# Altium PCB XRACER-R07.PcbDoc (part 2 of 2)
Units mm, origin at the board's own origin, x right, y up, seen from the top; angles counter-clockwise.
Board outline 36 x 36 mm, 4 copper layers (TOP, 2, 3, BOT); 135 components, 122 nets, 557 pads, 407 vias.
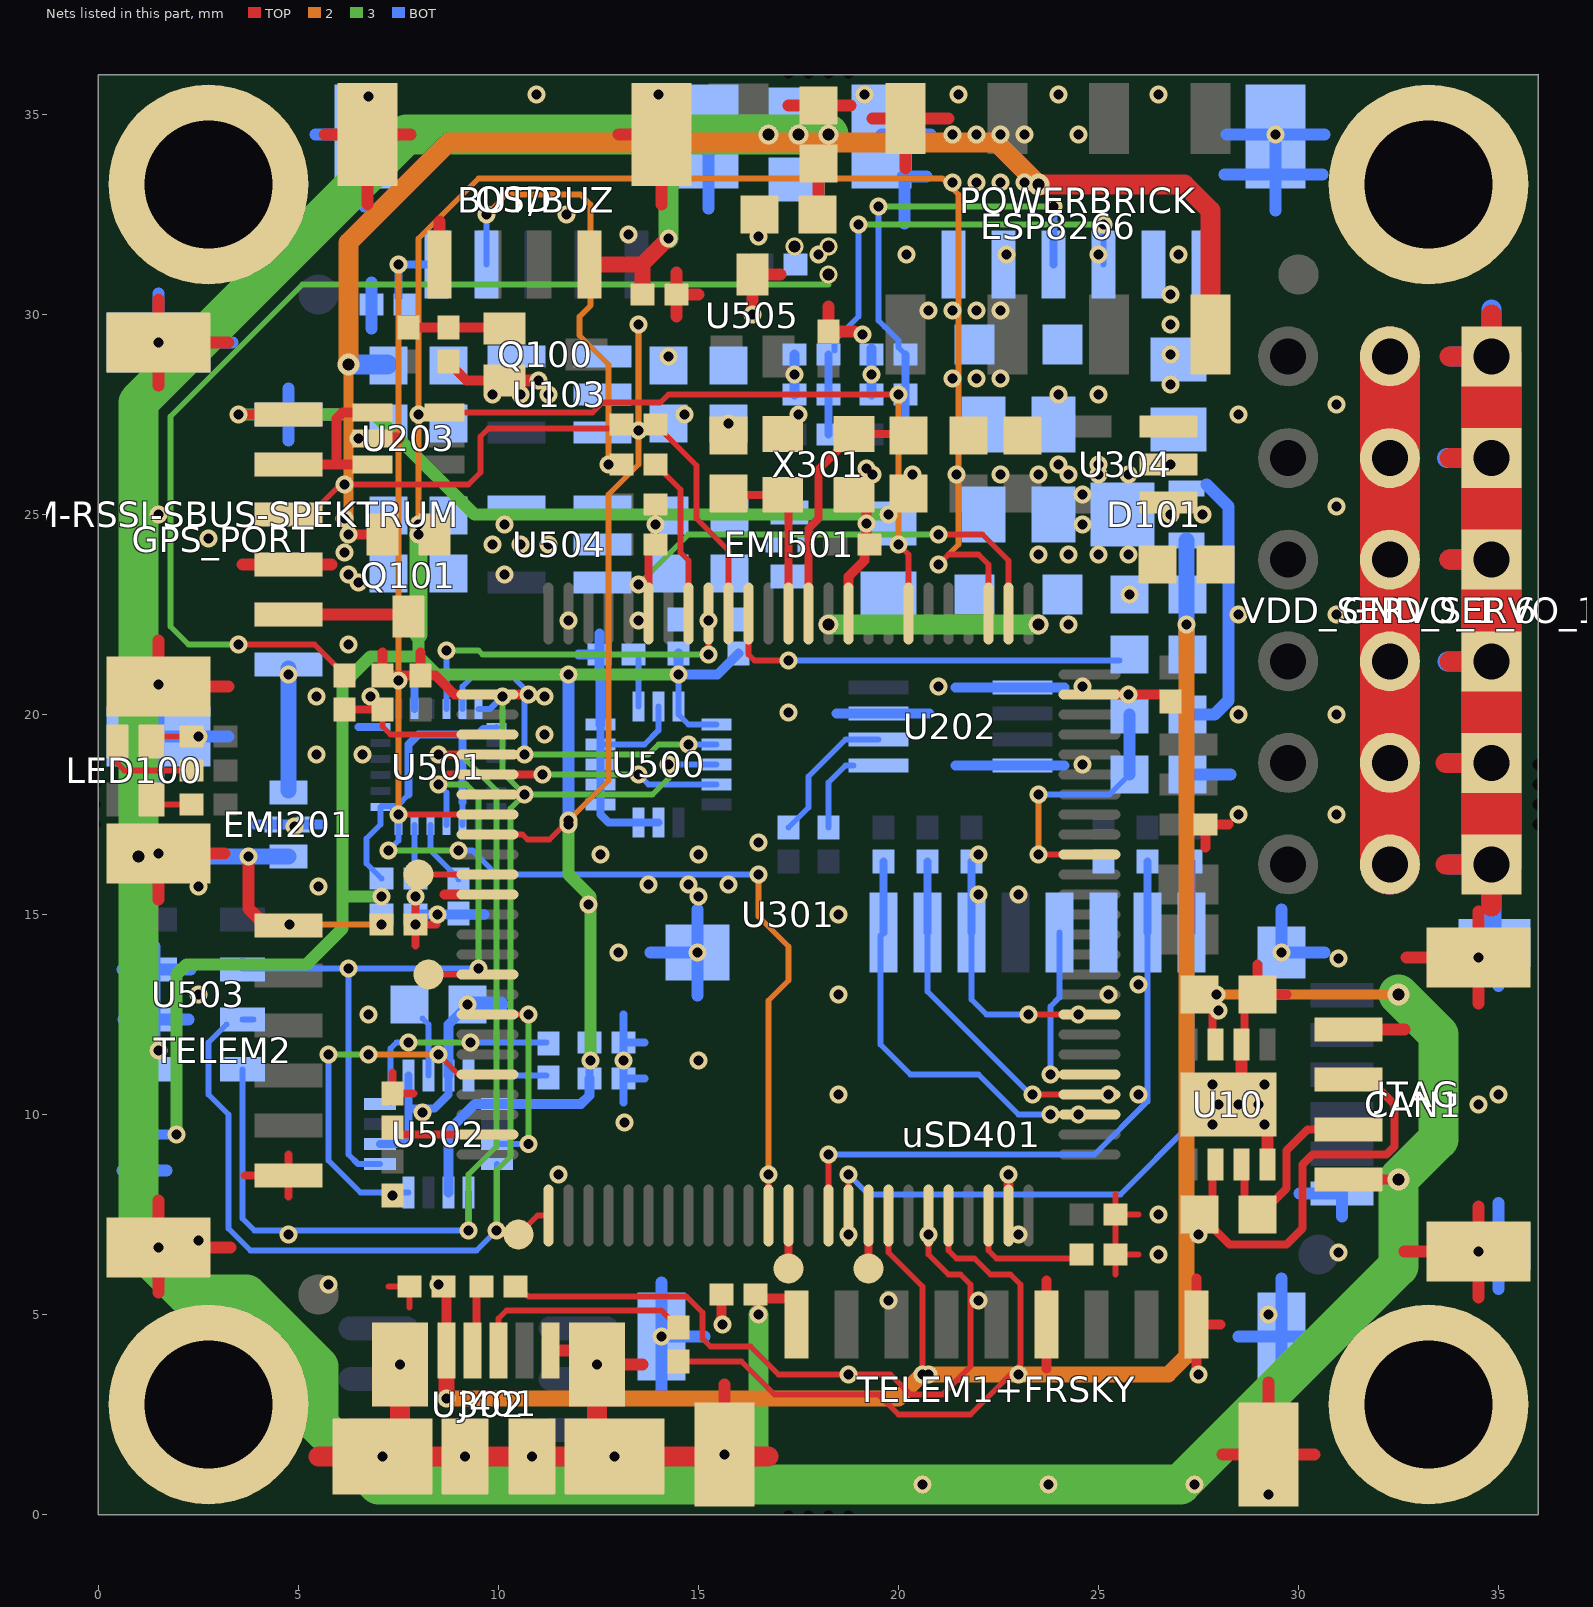
[diagram p4: the nets of this part, all layers, seen from the top]

## Via types
v1: diameter 0.45, hole 0.25, TOP to 2, tented both sides, 152 vias
v2: diameter 0.45, hole 0.25, 3 to BOT, tented bottom, 135 vias
v3: diameter 0.45, hole 0.25, TOP to BOT, tented both sides, 87 vias
v4: diameter 0.45, hole 0.25, TOP to 2, tented top, 6 vias
v5: diameter 0.45, hole 0.25, 3 to BOT, 6 vias
v6: diameter 0.45, hole 0.25, 3 to BOT, tented both sides, 5 vias
v7: diameter 0.5, hole 0.3, 3 to BOT, tented bottom, 5 vias
v8: diameter 0.45, hole 0.3, 3 to BOT, tented bottom, 3 vias
v9: diameter 0.45, hole 0.25, TOP to BOT, tented top, 3 vias
v10: diameter 0.55, hole 0.3, TOP to BOT, tented both sides, 3 vias
v11: diameter 0.55, hole 0.3, 3 to BOT, tented bottom, 1 vias
v12: diameter 0.55, hole 0.3, TOP to 2, tented top, 1 vias

## Nets (pads, with @x,y where several pads share a name; then routed paths per layer and width w, separated by ;. In a path a pad name is that pad's centre, name@x,y a point inside that pad or via, vN(x,y) a via of type N, cw(c..) or ccw(c..) an arc to the next point about the centre after c; other vN are vias at no path point) (continued)
GND: BUT/BUZ.GND C103.1 C105.1 C118.1 C119.1 C120.1 C301.1 C302.1 C303.1 C304.2 C305.2 C310.1 C311.1 C312.1 C313.1 C314.1 C315.1 C316.1 C317.1 C318.1 C319.1 C401.1 C402.2 C403.2 C404.1 C405.2 C501.1 C502.1 C503.1 C505.1 C508.1 C509.1 C510.1 C511.1 C520.1 C521.1 C523.1 C524.1 C525.1 C526.1 C601.2 C602.2 C603.2 CAN1.4 CAN1.GND EMI201.3 EMI201.4 EMI501.3 EMI501.4 ESP8266.2 G1.1 G2.1 G3.1 G4.1 GND_SERVO_1_6.1 GND_SERVO_1_6.2 GND_SERVO_1_6.3 GND_SERVO_1_6.4 GND_SERVO_1_6.5 GND_SERVO_1_6.6 GPS_PORT.6 GPS_PORT.GND J401.5 J401.6 J401.7 JTAG.6 JTAG.GND OSD.4 OSD.GND POWERBRICK.1 POWERBRICK.2 POWERBRICK.GND PPM-RSSI-SBUS-SPEKTRUM.4 PPM-RSSI-SBUS-SPEKTRUM.GND Q100.2 R104.1 R105.2 R131.2 R140.1 R301.2 R404.2 R407.2 R408.2 R431.2 TELEM1+FRSKY.6 TELEM1+FRSKY.9 TELEM1+FRSKY.GND TELEM2.6 TELEM2.GND TVS103.1 U10.2 U10.8 U10.EP U103.2 U202.1 U202.4 U202.7 U203.2 U301.10 U301.20 U301.27 U301.37 U301.74 U301.99 U302.4 U304.2 U500.7 U500.8 U500.9 U500.10 U500.11 U500.12 U500.13 U500.15 U501.11 U501.18 U501.20 U502.6 U502.9 U502.11 U503.2 U503.3 U504.2 U505.3 uSD401.6 uSD401.GND X301.2 X301.4 | length 286.2
  TOP w0.15: 7.25,5.7 C401.1@7.775,5.7 7.775,5.175 ; 25.425,6 C311.1@25.425,7.5 ; C305.2@25.425,6.5 26,6.5 ; 25.425,8 C311.1@25.425,7.5 ; 26,7.5 C311.1@25.425,7.5
  TOP w0.2: 3.65,8.475 TELEM2.6@4.75,8.475 ; 4.75,7.95 TELEM2.6@4.75,8.475 ; 4.75,9 TELEM2.6@4.75,8.475 ; 7.35,11.05 C304.2@7.35,10.525 7.875,10.525 ; 7.925,14.225 v1(7.925,14.75) ; 7.925,15.275 v1(7.925,14.75) ; 8.45,14.75 v1(7.925,14.75) ; U301.20@13.75,22.525 C316.1@13.75,24.1 ; C316.1@13.925,24.25 C315.1@13.925,25.25 ; U10.2@28.65,12.089 C404.1@28.65,12.6
  TOP w0.25: 7.1,21.55 R431.2@7.1,20.975 8.425,20.975 8.9,20.5 U301.27@9.725,20.5 v1(10.75,20.5) ; C312.1@8.05,20.975 8.05,21.55 ; 8.65,15.5 U301.37@9.725,15.5 ; R131.2@8.75,28.825 8.75,28.8 9.2,28.35 Q100.2@10.15,28.35 ; v1@15.575,4.9 C603.2@15.575,5.5 ; U301.10@18.75,22.525 18.75,23.45 19.15,23.85 C313.1@19.15,24 ; C313.1@19.2,24.45 X301.2@19.2,25.1 ; U301.74@22.75,7.475 v3@22.75,8.45 ; 23.7,3.65 23.7,5.85 ; U301.99@24.775,20.5 C310.1@26.65,20.5 ; 27.45,3.6 27.45,5.9 ; TELEM1+FRSKY.9@27.45,4.75 28.05,4.75 ; 27.675,16.675 R301.2@27.675,17.25 28.25,17.25 ; 28.975,13.75 C404.1@28.975,13 29.7,13
  TOP w0.3: 1.5,5.55 1.5,7.85 ; v1(1.5,6.675) 3.3,6.675 ; 1.5,15.375 v1(1.5,16.525) 3.15,16.525 ; 1.5,21.85 PPM-RSSI-SBUS-SPEKTRUM.GND@1.5,20.7 3.25,20.7 ; 1.5,28.225 v1(1.5,29.3) ; 1.5,30.375 v1(1.5,29.3) ; 3.25,29.3 v1(1.5,29.3) ; 3.6,23.75 5.825,23.75 ; 5.65,34.5 OSD.GND@6.725,34.5 ; 6.725,32.75 OSD.GND@6.725,34.5 ; U203.2@6.85,26.9 7.5,26.9 ; 7.8,34.5 OSD.GND@6.725,34.5 ; OSD.4@8.525,31.25 8.525,32.325 ; Q100.2@10.15,28.35 v1(11,28.35) ; J401.5@11.3,4.1 J401.6@12.112,4.1 ; v1(12.462,3.75) 13.6,3.75 ; 13,34.5 OSD.GND@14.075,34.5 14.075,32.75 ; 14.45,29.95 14.45,31.05 ; C601.2@14.45,30.5 15,30.5 ; v1(15.65,1.5) 15.65,3.25 ; v1@16.35,30.2 U505.3@16.35,31 17.05,31 ; 17.25,35.225 18.8,35.225 ; 18.25,30.2 C505.1@18.25,29.575 v1@18.9,29.575 ; 19.35,34.9 21.255,34.9 ; 20.18,33.65 ESP8266.2@20.18,34.9 ; 28.1,1.5 TELEM1+FRSKY.GND@29.25,1.5 ; U10.EP@28.575,10.575 U10.2@28.575,11.75 ; U10.8@29.225,8.75 U10.EP@29.225,9.55 ; 29.25,3.3 TELEM1+FRSKY.GND@29.25,1.5 ; 30.4,1.5 TELEM1+FRSKY.GND@29.25,1.5 ; CAN1.4@31.25,12.125 32.65,12.125 ; 32.65,6.575 v3(34.5,6.575) ; 32.7,13.925 v3(34.5,13.925) ; 34.5,5.425 34.5,7.7 ; 34.5,12.775 v3(34.5,13.925) ; 34.5,15.075 v3(34.5,13.925)
  TOP w0.5: 5.5,1.45 16.75,1.45 ; J401.7@7.538,1.887 v1(7.538,3.75) ; J401.7@12.462,1.887 v1(12.462,3.75) ; 33.673,16.25 GND_SERVO_1_6.1@34.823,16.25 34.823,15.2 ; 33.673,18.79 GND_SERVO_1_6.2@34.823,18.79 ; 33.77,21.33 GND_SERVO_1_6.3@34.823,21.33 ; 33.77,23.87 GND_SERVO_1_6.4@34.823,23.87 ; 33.77,26.41 GND_SERVO_1_6.5@34.823,26.41 ; 33.77,28.95 GND_SERVO_1_6.6@34.823,28.95 34.823,30.003
  TOP w1.5: GND_SERVO_1_6.1@34.823,16.25 GND_SERVO_1_6.2@34.823,18.79 GND_SERVO_1_6.3@34.823,21.33 GND_SERVO_1_6.4@34.823,23.87 GND_SERVO_1_6.5@34.823,26.41 GND_SERVO_1_6.6@34.823,28.95
  3 w0.3: 33.75,16.25 GND_SERVO_1_6.1@34.823,16.25 34.823,15.177 ; 33.75,18.79 GND_SERVO_1_6.2@34.823,18.79 ; 33.75,21.33 GND_SERVO_1_6.3@34.823,21.33 ; 33.75,23.87 GND_SERVO_1_6.4@34.823,23.87 ; 33.75,26.41 GND_SERVO_1_6.5@34.823,26.41 ; 33.75,28.95 GND_SERVO_1_6.6@34.823,28.95 34.823,30.023
  3 w1.2: GND_SERVO_1_6.1@34.823,16.25 GND_SERVO_1_6.2@34.823,18.79 GND_SERVO_1_6.3@34.823,21.33 GND_SERVO_1_6.4@34.823,23.87 GND_SERVO_1_6.5@34.823,26.41 GND_SERVO_1_6.6@34.823,28.95
  2 w0.3: 33.746,16.25 GND_SERVO_1_6.1@34.823,16.25 34.823,15.173 ; 33.746,18.79 GND_SERVO_1_6.2@34.823,18.79 ; 33.746,21.33 GND_SERVO_1_6.3@34.823,21.33 ; 33.746,23.87 GND_SERVO_1_6.4@34.823,23.87 ; 33.746,26.41 GND_SERVO_1_6.5@34.823,26.41 ; 33.746,28.95 GND_SERVO_1_6.6@34.823,28.95 34.823,30.027
  2 w1.2: GND_SERVO_1_6.1@34.823,16.25 GND_SERVO_1_6.2@34.823,18.79 GND_SERVO_1_6.3@34.823,21.33 GND_SERVO_1_6.4@34.823,23.87 GND_SERVO_1_6.5@34.823,26.41 GND_SERVO_1_6.6@34.823,28.95
  BOT w0.15: C501.1@7.9,15.925 U501.11@7.9,17.241 ; U500.12@12.552,19.25 13.65,19.25 14.002,19.602 U500.15@14.002,20.2
  BOT w0.2: 6.5,19.691 U501.18@7.05,19.691 ; U502.6@7.039,9.259 7.609,9.259 7.75,9.4 U502.9@7.75,10.97 ; 7.75,10.15 8.4,10.15 8.75,10.5 U502.11@8.75,10.97 ; U501.20@7.9,20.141 7.9,20.75 ; U302.4@12.155,0.9 C301.1@13.4,0.9 ; U500.13@12.552,19.75 U500.12@12.552,19.25 U500.11@12.552,18.75 U500.10@12.552,18.25 U500.9@12.552,17.75 12.552,17.498 12.75,17.3 U500.7@14.002,17.3 ; 13.125,10.3 C521.1@13.125,10.9 ; 13.125,12.5 C520.1@13.125,11.8 ; 13.65,10.9 C521.1@13.125,10.9 ; 13.65,11.8 C520.1@13.125,11.8 ; C521.1@13.125,10.9 C520.1@13.125,11.8
  BOT w0.25: 3.9,17.25 EMI201.4@4.35,17.25 5.6,17.25 ; C502.1@7.925,15 9.65,15 ; U502.11@8.75,10.97 8.75,12.25 C523.1@9.225,12.725 ; 12,21.5 C526.1@12.525,21.5 ; 12.525,20.975 C526.1@12.525,21.5 ; 12.525,22.025 C526.1@12.525,21.5 ; U500.13@12.552,19.75 12.552,20.85 ; C405.2@17.4,28 R407.2@17.4,29 ; 18.45,20.025 20.775,20.025 ; C403.2@19.325,28 R408.2@19.325,29.15 ; 21.425,18.725 24.15,18.725 ; 21.425,20.675 24.15,20.675
  BOT w0.3: 0.6,8.6 1.7,8.6 ; 0.6,13.625 2.3,13.625 ; 0.625,12.375 2.25,12.375 ; 1.15,8 C508.1@1.15,8.575 ; 1.4,11.8 1.4,14.2 ; 1.5,18.3 1.5,20.55 ; GPS_PORT.GND@1.5,19.45 3.25,19.45 ; 1.5,28.075 v1(1.5,29.3) ; 1.5,30.525 v1(1.5,29.3) ; 3.35,29.3 v1(1.5,29.3) ; 4.75,26.85 4.75,28.15 ; GPS_PORT.6@4.75,27.5 5.975,27.5 ; 5.425,34.5 BUT/BUZ.GND@6.65,34.5 ; 6.65,32.7 BUT/BUZ.GND@6.65,34.5 ; 6.825,29.65 6.825,30.8 ; 7.875,34.5 BUT/BUZ.GND@6.65,34.5 ; 10.5,0.845 U302.4@12,0.845 ; C301.1@13.6,1.075 14.35,1.075 ; 13.8,14.05 v2(14.977,14.05) ; 14.025,34.5 15.25,34.5 15.25,32.65 ; 14.077,2.95 v6(14.077,4.45) ; 14.077,5.798 v6(14.077,4.45) ; 14.977,12.977 v2(14.977,14.05) ; 14.977,15.123 v2(14.977,14.05) ; 15.15,4.45 v6(14.077,4.45) ; POWERBRICK.GND@19.575,34.5 20.8,34.5 ; POWERBRICK.GND@20.1,33.45 20.7,33.45 ; 20.15,32.275 POWERBRICK.GND@20.15,33.5 ; 27.225,17.8 R105.2@27.225,18.5 28.298,18.5 ; 28.15,33.5 30.6,33.5 ; 28.2,34.5 v3(29.425,34.5) ; 28.5,4.45 uSD401.GND@29.577,4.45 ; 29.425,32.6 v3(29.425,34.5) ; 29.577,2.9 uSD401.GND@29.577,4.45 ; 29.577,5.9 uSD401.GND@29.577,4.45 ; 29.577,15.123 v2(29.577,14.05) 30.65,14.05 ; 30.021,8.023 JTAG.6@31.094,8.023 31.094,7.45 ; 30.65,4.45 uSD401.GND@29.577,4.45 ; 30.65,34.5 v3(29.425,34.5) ; 33.7,6.715 JTAG.GND@35.006,6.715 ; 33.785,14.285 35.006,14.285 35.006,13.212 ; 35.006,5.642 JTAG.GND@35.006,6.715 ; 35.006,7.788 JTAG.GND@35.006,6.715
  BOT w0.4: v2(9.225,12.75) 10.05,12.75
  BOT w0.5: 33.71,18.79 GND_SERVO_1_6.2@34.823,18.79 ; 33.71,26.41 GND_SERVO_1_6.5@34.823,26.41 ; 33.72,21.33 GND_SERVO_1_6.3@34.823,21.33 ; 33.75,16.25 GND_SERVO_1_6.1@34.823,16.25 JTAG.GND@34.823,14.467 ; 33.77,23.87 GND_SERVO_1_6.4@34.823,23.87 ; 33.8,28.95 GND_SERVO_1_6.6@34.823,28.95 34.823,30.123
  BOT w1.5: GND_SERVO_1_6.1@34.823,16.25 GND_SERVO_1_6.2@34.823,18.79 GND_SERVO_1_6.3@34.823,21.33 GND_SERVO_1_6.4@34.823,23.87 GND_SERVO_1_6.5@34.823,26.41 GND_SERVO_1_6.6@34.823,28.95
  other v1: 20.6,0.75 23.75,0.75 27.4,0.75 7.1,1.45 9.165,1.45 10.835,1.45 12.9,1.45 15.6,4.75 31,6.55 4.75,7 7.35,7.975 27.85,9.75 29.15,9.75 8.1,10.05 28.5,10.25 26,10.5 27.85,10.75 29.15,10.75 1.5,11.6 26,13.25 12.25,15.25 22,15.5 23,15.5 13.75,15.75 14.75,15.75 15.75,15.75 22,16.5 4.9,17.2 6.6,19 28.5,20 25.75,20.5 1.5,20.75 4.75,21 6.25,21.75 28.5,22.5 6.25,23.5 10.15,23.5 10.15,24.75 13.925,24.75 19.2,24.775 1.5,25 19.2,26.15 24,26.25 25,26.25 26.8,26.25 14.65,27.5 17.5,27.5 24,28 25,28 26.8,28.25 14.25,28.95 26.8,29 19.1,29.5 26.8,29.75 16.35,30 26.8,30.5 18,31.5 20.2,31.5 22.7,31.5 25,31.5 27,31.5 13.25,32 11.7,32.5
  other v2: 18.75,3.5 20.75,3.5 23,3.5 27.5,3.5 19.75,5.35 22,5.35 5.75,5.75 8.5,5.75 2.5,6.85 18.75,7 20.75,7 23,7 27.5,7 11.5,8.5 13.15,9.8 24.5,10 28,10.25 29,10.25 25.25,10.5 35,10.5 13.125,11.35 15,11.35 24.5,12.5 28,12.6 2.5,13 18.5,13 13,14.05 8.475,15 18.5,15 7.925,15.45 15,15.45 2.5,15.7 5.5,15.7 12.55,16.5 15,16.5 16.5,16.8 24.6,18.75 5.45,19 2.5,19.45 11.15,19.5 17.25,20.05 5.45,20.45 6.8,20.45 11.15,20.45 21,20.7 24.6,20.7 7.5,20.85 11.75,22.35 13.5,22.35 15.25,22.35 25.775,23 6.5,23.3 6.15,24.05 9.85,24.25 10.55,24.25 11.25,24.25 2.75,24.4 6.15,24.9 6.15,25.75 19.35,26 20.35,26 21.45,26 22.55,26 6.5,26.9 15.75,27.278 8,27.5 9.85,28 10.55,28 11.25,28 21.35,28.4 21.95,28.4 22.55,28.4 17.4,28.5 19.325,28.5 20.75,30.1 21.35,30.1 21.95,30.1 22.55,30.1 21.35,33.3 21.95,33.3 22.55,33.3 23.15,33.3 21.35,34.5 21.95,34.5 22.55,34.5 23.15,34.5 24.5,34.5
  other v3: 29.25,0.5 29.25,5 26.5,6.5 26.5,7.5 22.75,8.5 34.5,10.25 6.75,12.5 31,13.9 28.5,17.5 30.95,17.5 30.95,20 30.95,22.5 30.95,25.2 30.95,27.75 6.75,35.45 10.95,35.5 14,35.5 19.15,35.5 21.5,35.5 24,35.5 26.5,35.5
  other v6: 18.5,10.5 25.25,13
HMC5983_CS: U301.46 U502.4 | length 9.2
  TOP w0.15: v1(8.5,11.5) 9,11 U301.46@9.725,11
  3 w0.15: v5(5.75,11.5) v3(6.75,11.5)
  2 w0.15: v3(6.75,11.5) v1(8.5,11.5)
  BOT w0.15: v5(5.75,11.5) 5.75,8.85 6.551,8.049 U502.4@7.75,8.049
HMC5983_DRDY: U301.43 U502.15 | length 5.1
  TOP w0.15: U301.43@9.725,12.5 v3(10.75,12.5)
  3 w0.15: v5(10.75,9.259) v3(10.75,12.5)
  BOT w0.15: U502.15@9.96,9.259 v5(10.75,9.259)
LED_SAFETY: R403.2 U301.18 | length 4.1
  TOP w0.15: R403.2@13.925,26.25 14.55,25.625 14.55,24.05 14.75,23.85 U301.18@14.75,22.525
MPU9250_CS: U301.17 U501.22 | length 9.1
  TOP w0.15: v3(15.25,21.5) U301.17@15.25,22.525
  3 w0.15: v9(8.7,21.6) 9.5,21.6 9.6,21.5 v3(15.25,21.5)
  BOT w0.15: U501.22@8.7,20.141 v9(8.7,21.6)
MPU9250_DRDY: U301.62 U501.12 | length 19.3
  TOP w0.15: U301.62@16.75,7.475 v1(16.75,8.5)
  3 w0.15: v2(7.25,16.6) v5(9,16.6)
  2 w0.15: v3(16.5,16) 16.5,14.95 17.25,14.2 17.25,13.35 16.75,12.85 v1(16.75,8.5)
  BOT w0.15: v2(7.25,16.6) 7.5,16.85 U501.12@7.5,17.241 ; v5(9,16.6) 9.35,16.6 9.95,16 v3(16.5,16)
MPU9250_MISO: U301.31 U500.4 U501.9 U502.5 U503.6 | length 25.3
  TOP w0.2: v3(8.5,18.25) 8.75,18.5 v3(11.1,18.5)
  3 w0.15: v3(8.5,18.25) 9.2,18.25 9.5,17.95 v5(9.5,13.65) ; v3(11.1,18.5) v2(13.5,18.5)
  BOT w0.15: U503.6@3.6,13.65 U503.6@3.6,13.85 ; U503.6@3.625,13.65 v5(9.5,13.65) ; v2(6.25,13.65) 6.25,9 6.491,8.759 U502.5@7.039,8.759 ; v3(8.5,18.25) 8.7,18.05 U501.9@8.7,17.241 ; v2(13.5,18.5) 13.75,18.25 U500.4@15.452,18.25
MPU9250_MOSI: U301.32 U500.3 U501.24 U502.16 U503.7 | length 35.4
  TOP w0.15: U301.32@9.725,18 v3(10.65,18)
  3 w0.15: v5(9.95,7.1) 9.95,8.6 10.3,8.95 10.3,17.65 v3(10.65,18) ; v2(10.1,20.45) 10.1,18.55 v3(10.65,18) ; v2(14.25,18.75) 14.25,18.4 13.85,18 v3(10.65,18)
  BOT w0.15: U503.7@3.2,12.25 2.75,11.8 2.75,10.5 3.25,10 3.25,7.15 3.8,6.6 9.45,6.6 v5(9.95,7.1) ; U503.7@3.6,12.375 U503.7@3.875,12.375 ; U501.24@9.5,20.141 9.791,20.141 v2(10.1,20.45) ; v5@9.96,7.11 U502.16@9.96,8.759 ; v2(14.25,18.75) U500.3@15.452,18.75
MPU9250_SCK: U301.30 U500.2 U501.23 U502.1 U503.8 | length 34.6
  TOP w0.2: v3(8.5,19) v3(10.65,19)
  3 w0.15: v3(8.5,19) 9.05,19 9.95,18.1 9.95,9.2 9.25,8.5 v5(9.25,7.1) ; v3(10.65,19) 13.75,19 14,19.25 v2(14.75,19.25)
  BOT w0.15: U503.8@3.6,11.125 3.6,7.4 3.9,7.1 v5(9.25,7.1) U502.1@9.25,8.049 ; U501.23@9.1,20.141 9.1,20.7 9.35,20.95 10.35,20.95 10.65,20.65 v3(10.65,19) ; v2(14.75,19.25) U500.2@15.452,19.25
NetA8_1: A8.1 U301.67 | length 1.3
  TOP w0.2: A8.1@19.25,6.15 U301.67@19.25,7.475
NetB1_1: B1.1 U301.36 | length 1.7
  TOP w0.15: B1.1@8,16 U301.36@9.725,16
NetB12_1: B12.1 U301.51 | length 0.9
  TOP w0.15: B12.1@10.5,7 10.975,7.475 U301.51@11.25,7.475
NetBUT/BUZ_2: BUT/BUZ.2 R403.1 | length 11.1
  2 w0.15: v3(9.7,32.5) 10.2,33 12.05,33 12.3,32.75 12.3,30.222 12.025,29.947 12.025,29.475 12.75,28.75 v1(12.75,26.25)
  BOT w0.15: BUT/BUZ.2@9.7,31.25 v3(9.7,32.5)
NetC6_1: C6.1 U301.63 | length 1.3
  TOP w0.2: C6.1@17.25,6.15 U301.63@17.25,7.475
NetC103_2: C103.2 D101.2 FR102.2 R103.1 TVS103.2 | length 6.8
  BOT w0.3: R103.1@27.225,20 27.9,20 28.25,20.35 28.25,25.2 27.7,25.75
NetC304_1: C304.1 U301.49 | length 2.5
  TOP w0.2: C304.1@7.25,9.5 U301.49@9.725,9.5
NetC305_1: C305.1 U301.73 | length 3.2
  TOP w0.15: U301.73@22.25,7.475 22.25,6.6 22.45,6.4 C305.1@24.475,6.4
NetC403_1: C403.1 POWERBRICK.3 R408.1 R422.2 | length 11.8
  3 w0.15: v2(19.5,32.7) v2(23.875,32.7)
  BOT w0.15: v2(19.5,32.7) 19.5,29.85 19.65,29.7 20,29.35 20,29.175 R408.1@20.175,29
  BOT w0.2: R422.2@20.175,27 C403.1@20.175,28 R408.1@20.175,29 ; POWERBRICK.3@23.875,31.25 v2(23.875,32.7)
NetC405_1: C405.1 POWERBRICK.4 R407.1 R423.2 | length 12.5
  3 w0.15: v2(19,32.25) v2(25.125,32.25)
  BOT w0.15: R407.1@18.4,29.1 18.4,29.35 19,29.95 v2(19,32.25) ; POWERBRICK.4@25.125,31.25 v2(25.125,32.25)
  BOT w0.2: R423.2@18.25,27 C405.1@18.25,28 R407.1@18.25,29
NetC503_2: C503.2 U501.10 | length 1.7
  BOT w0.15: U501.10@8.3,17.241 8.3,16.6 9,15.9 C503.2@9,15.875
NetC509_2: C509.2 EMI501.2 R501.2 U504.1
NetC522_1: C522.1 U502.12 | length 2
  BOT w0.15: U502.12@9.25,10.97 C522.1@11.205,10.97
NetC522_2: C522.2 U502.8 | length 5.3
  3 w0.15: v2(7.75,11.8) v2(9.3,11.8)
  BOT w0.15: U502.8@7.3,10.3 7.3,11.65 7.45,11.8 v2(7.75,11.8) ; v2(9.3,11.8) C522.2@11.2,11.8
NetC523_2: C523.2 U502.10 | length 1.5
  BOT w0.15: C523.2@8.1,12.4 8.25,12.25 U502.10@8.25,10.97
NetC526_2: C526.2 U500.14 | length 1.2
  BOT w0.15: U500.14@13.502,20.2 C526.2@13.502,21.373
NetCAN1_2: CAN1.2 R405.1 U10.7 | length 3.8
  TOP w0.2: R405.1@28.65,7.939 U10.7@28.65,8.45 ; R405.1@29.3,7.75 29.7,8.15 29.7,9.1 30.225,9.625 CAN1.2@31.25,9.625
NetCAN1_3: CAN1.3 R405.2 U10.6 | length 9.3
  TOP w0.2: R405.2@27.525,7.5 28.275,6.75 29.7,6.75 30.1,7.15 30.1,8.75 30.35,9 32.2,9 32.4,9.2 32.4,10.25 CAN1.3@31.95,10.7 ; R405.2@27.85,7.939 U10.6@27.85,8.45
NetD102_2: D102.2 FR106.1
NetE10_1: E10.1 U301.41 | length 1.5
  TOP w0.15: E10.1@8.25,13.5 U301.41@9.725,13.5
NetEMI201_2: EMI201.2 GPS_PORT.1 | length 3.1
  BOT w0.4: EMI201.2@4.75,18.1 GPS_PORT.1@4.75,21.15
NetJ401_2: J401.2 R441.1 | length 1
  TOP w0.2: J401.2@9.45,4.65 R441.1@9.45,5.675
NetJ401_3: J401.3 R442.1 | length 5.6
  TOP w0.15: J401.3@10,4.1 10,4.9 10.2,5.1 14.075,5.1 R442.1@14.5,4.675
NetLED100_1: LED100.1 R115.2 | length 2.5
  TOP w0.15: LED100.1@0.475,19.325 0.475,18.775 0.65,18.6 R115.2@2.325,18.6
NetLED100_2: LED100.2 R114.2 | length 0.9
  TOP w0.15: LED100.2@1.45,19.45 R114.2@2.325,19.45
NetLED100_3: LED100.3 R113.2 | length 0.9
  TOP w0.15: LED100.3@1.45,17.75 R113.2@2.325,17.75
"NetPOWER LED_2": "POWER LED.2" R140.2 | length 1.3
  TOP w0.3: 18,32.525 R140.2@18,33.775
NetPPM-RSSI-SBUS-SPEKTRUM_3: PPM-RSSI-SBUS-SPEKTRUM.3 R201.1 | length 9.8
  TOP w0.15: PPM-RSSI-SBUS-SPEKTRUM.3@4.75,25 5.3,25 6.05,25.75 9.25,25.75 9.55,26.05 9.55,26.95 9.75,27.15 12.975,27.15 R201.1@13.075,27.25
NetQ100_3: Q100.3 R130.1 R131.1 | length 2.4
  TOP w0.25: R130.1@7.75,29.675 R131.1@8.75,29.675 Q100.3@10.125,29.675
NetR452_2: R452.2 U202.6 | length 3.6
  BOT w0.15: R452.2@17.25,17.175 17.75,17.675 17.75,18.45 18.675,19.375 U202.6@19.5,19.375
NetR454_2: R454.2 U202.5 | length 1.9
  BOT w0.15: R454.2@18.25,17.175 18.25,18.3 18.675,18.725 U202.5@18.875,18.725
OSC_IN: C302.2 U301.12 X301.3 | length 6.3
  TOP w0.2: U301.12@17.75,22.525 17.75,24.65 18,24.9 18,26.123 X301.3@18.889,27.012 C302.2@20.213,27.012
OSC_OUT: C303.2 U301.13 X301.1 | length 4.1
  TOP w0.2: C303.2@15.787,25.488 X301.1@17.111,25.488 ; U301.13@17.25,22.525 X301.1@17.25,25.349
OTG_FS_DM: R441.2 U301.70 | length 17.5
  TOP w0.15: R441.2@10.425,5.7 10.5,5.7 10.75,5.45 14.7,5.45 15.1,5.05 15.1,4.4 15.3,4.2 16.3,4.2 17,3.5 19.8,3.5 20.3,3 21.1,3 21.8,3.7 21.8,5.75 21.55,6 21.25,6 20.75,6.5 U301.70@20.75,7.475
OTG_FS_DP: R442.2 U301.71 | length 14.6
  TOP w0.15: R442.2@14.5,3.825 16.075,3.825 16.9,3 19.5,3 20,2.5 21.8,2.5 23.05,3.75 23.05,5.75 22.8,6 22.3,6 21.9,6.4 21.45,6.4 21.25,6.6 U301.71@21.25,7.475
PERIPH_3V3_EN: R118.1 U103.3 U301.34 | length 18.3
  TOP w0.15: U301.34@9.725,17 10.6,17 10.725,16.875 11.275,16.875 v1(11.75,17.35)
  3 w0.15: v2(13.5,27.1) v3(13.5,29.75)
  2 w0.15: v1(11.75,17.35) 12.75,18.35 ; 12.75,18.65 12.75,18.35 ; v3(13.5,29.75) 13.5,26.25 12.75,25.5 12.75,18.35
RC_INPUT: PPM-RSSI-SBUS-SPEKTRUM.2 U203.1 U203.3 | length 4.2
  TOP w0.25: PPM-RSSI-SBUS-SPEKTRUM.2@4.75,26.25 5.95,26.25 ; U203.3@6.85,26.25 5.95,26.25 ; U203.1@6.85,27.55 6.1,27.55 5.95,27.4 5.95,26.25
RSSI_IN: R201.2 U301.16 | length 5.5
  TOP w0.15: R201.2@13.925,27.25 14.95,26.225 14.95,24.9 15.75,24.1 U301.16@15.75,22.525
SAFETY_SWITCH_IN: BUT/BUZ.1 R404.1 U301.33 | length 17.8
  TOP w0.15: v1(7.5,17.5) U301.33@9.725,17.5
  2 w0.15: v1(7.5,17.5) v3(7.5,31.25)
  BOT w0.2: R404.1@7.5,30.425 v3(7.5,31.25) BUT/BUZ.1@8.45,31.25
SBUS_INV: U203.6 U301.7 | length 17.1
  TOP w0.15: U203.6@8.65,27.55 12.35,27.55 12.6,27.8 14.05,27.8 14.25,28 v1(20,28) ; v1(20,24.25) 20.25,24 U301.7@20.25,22.525
  2 w0.15: v1(20,24.25) v1(20,28)
SDIO_CK: U301.80 uSD401.5 | length 4.6
  TOP w0.15: v3(23.8,11) U301.80@24.775,11
  BOT w0.15: v3@23.75,11 23.8,11.05 23.8,12.7 24.027,12.927 uSD401.5@24.027,14.55
SDIO_CMD: R411.1 U301.83 uSD401.3 | length 6.6
  TOP w0.15: v3(23.25,12.5) U301.83@24.775,12.5
  BOT w0.15: uSD401.3@21.827,14.55 21.827,12.873 22.2,12.5 v3(23.25,12.5)
  BOT w0.2: uSD401.3@21.827,14.55 R411.1@21.827,16.325
SDIO_D0: R410.1 U301.65 uSD401.7 | length 16
  TOP w0.15: U301.65@18.25,7.475 v3(18.25,9)
  BOT w0.15: v3(18.25,9) 22.9,9 24.9,9 26.227,10.327 uSD401.7@26.227,14.55
  BOT w0.2: uSD401.7@26.227,14.55 R410.1@26.227,16.325
SDIO_D1: R401.1 U301.66 uSD401.8 | length 17.1
  TOP w0.15: U301.66@18.75,7.475 v3(18.75,8.5)
  BOT w0.15: v3(18.75,8.5) 19.25,8 25.55,8 27.327,9.777 uSD401.8@27.327,14.55
  BOT w0.2: uSD401.8@27.327,14.55 R401.1@27.327,16.325
SDIO_D2: R413.1 U301.78 uSD401.1 | length 10.6
  TOP w0.15: v3(23.8,10) U301.78@24.775,10
  BOT w0.15: uSD401.1@19.627,14.55 19.55,14.473 19.55,11.75 20.3,11 22,11 23,10 v3(23.8,10)
  BOT w0.2: uSD401.1@19.627,14.55 R413.1@19.627,16.325
SDIO_D3: R412.1 U301.79 uSD401.2 | length 8.3
  TOP w0.15: v3(23.35,10.5) U301.79@24.775,10.5
  BOT w0.15: uSD401.2@20.727,14.55 20.727,13.073 23.25,10.55 v3@23.25,10.5
  BOT w0.2: uSD401.2@20.727,14.55 R412.1@20.727,16.325
SPEKTRUM_POWER: Q101.3 U301.3 | length 33.8
  TOP w0.15: v1(21,23.75) 21.25,24 22,24 22.25,23.75 U301.3@22.25,22.525
  2 w0.15: v1(8,24.5) 8,31.9 9.5,33.4 21.1,33.4 21.5,33 21.5,24.25 v1(21,23.75)
VBUS: C401.2 D101.1 J401.1 R102.2 R104.2 U301.68 | length 47.1
  TOP w0.15: U301.68@19.75,7.475 19.75,6.55 20.6,5.7 v4(20.6,3.5)
  TOP w0.25: J401.1@8.7,4.1 C401.2@8.7,5.625
  TOP w0.4: v1(8.7,2.9) J401.1@8.7,4.1
  2 w0.4: v1(8.7,2.9) 20,2.9 v4(20.6,3.5) 26.75,3.5 27.2,3.95 v3(27.2,22.25)
  BOT w0.4: R102.2@27.2,21.5 D101.1@27.2,24.35
VBUS_VALID: R102.1 U301.15 | length 10.4
  TOP w0.15: U301.15@16.25,22.525 16.25,21.5 16.4,21.35 v3(17.25,21.35)
  BOT w0.15: v3(17.25,21.35) R102.1@25.525,21.35
VDD_3V3: C119.2 C120.2 ESP8266.7 Q101.2 U103.5 | length 35.5
  TOP w0.25: v1(6.25,24.5) Q101.2@7.1,24.5
  TOP w0.5: v12(23.5,33.25) 27.15,33.25 27.8,32.6 ESP8266.7@27.8,29.5
  2 w0.25: v1(6.25,24.5) v10(6.25,28.75)
  2 w0.5: v10(6.25,28.75) 6.25,31.8 8.75,34.3 22.45,34.3 v12(23.5,33.25)
  BOT w0.5: v10(6.25,28.75) C119.2@7.228,28.75
VDD_3V3_SENSORS: C501.2 C502.2 C508.2 C510.2 C511.2 C520.2 C521.2 C524.2 C525.2 U500.1 U500.16 U501.1 U501.8 U501.13 U502.2 U502.13 U503.1 U504.5 | length 59.8
  3 w0.3: v2(1.95,9.5) 1.95,13.5 2.2,13.75 5.2,13.75 6.1,14.65 6.1,15.45 ; v2(7.075,15.45) 6.1,15.45 ; 8,22 8,21.45 ; v6(11.75,17.25) 11.75,16 12.3,15.45 v2(12.3,11.35) ; v2(14.5,21) v2(11.75,21) 8.45,21 8,21.45 ; 6.1,15.45 6.1,20.75 6.8,21.45 8,21.45
  3 w0.45: 8,22 v2(8,24.75)
  BOT w0.15: C501.2@7.075,15.9 6.7,16.275 6.7,16.9 7.05,17.25 U501.13@7.05,17.691 7.075,17.716 7.466,17.716 7.75,18 ; U501.8@9.1,17.241 9.1,17.8 ; 9.45,19.5 9.616,19.666 9.925,19.666 U501.1@9.95,19.691 ; v2(14.5,21) 14.5,20 14.75,19.75 U500.1@15.452,19.75 ; C525.2@14.5,21.525 C525.2@14.5,21.525
  BOT w0.2: 7.75,18 7.75,19.25 8,19.5 9.45,19.5 ; 9.1,17.8 9.1,19.5 ; C521.2@12.275,10.9 C520.2@12.275,11.8 C520.2@12.275,11.9
  BOT w0.25: C508.2@1.15,9.5 U503.1@1.15,10.875 ; C508.2@1.225,9.5 v2(1.95,9.5) ; U502.2@8.75,8.049 8.75,9.6 9.409,10.259 U502.13@9.96,10.259 12.059,10.259 12.275,10.475 C521.2@12.275,10.9 ; C525.2@14.5,21.525 v2(14.5,21) 15.475,21 C524.2@16,21.525
  BOT w0.3: v6(11.75,17.25) v2(11.75,21)
VDD_3V3_SENSORS_EN: R501.1 U301.2 U504.3 | length 11.4
  TOP w0.15: v3(21,24.5) 22.1,24.5 22.75,23.85 U301.2@22.75,22.525
  3 w0.15: v2(13.5,23.25) 14.75,24.5 v3(21,24.5)
VDD_3V3_SPEKTRUM: PPM-RSSI-SBUS-SPEKTRUM.5 Q101.1 | length 3
  TOP w0.3: PPM-RSSI-SBUS-SPEKTRUM.5@4.75,22.5 Q101.1@7.75,22.5
VDD_5V_BRICK: FR102.1 POWERBRICK.5 POWERBRICK.6
VDD_5V_IN: "POWER LED.1" C105.2 C118.2 C317.2 D101.3 D102.1 EMI501.1 FR101.1 R118.2 R132.2 R430.2 U103.1 U304.1 U304.3 | length 33.2
  TOP w0.15: v3(3.5,21.75) 5.4,21.75 6.15,21 R430.2@6.15,20.975
  3 w0.15: v3(3.5,21.75) 2.25,21.75 1.8,22.2 1.8,27.45 5.1,30.75 18.25,30.75
  3 w0.5: v7(18.25,22.25) v7(23.5,22.25)
  other v2: 24.25,22.25 23.5,24 24.25,24 25,24 25.75,24 24.6,24.75 24.6,25.5 23.5,26 24.25,26 25,26 25.75,26
  other v3: 26.8,25 27.6,25 28.5,27.5 16.5,31.95
  other v8: 18.25,31 17.4,31.7 18.25,31.7
VDD_5V_PERIPH: C404.2 C601.1 C602.1 C603.1 CAN1.1 EMI201.1 FR101.2 OSD.1 TELEM1+FRSKY.1 TELEM2.1 U10.3 | length 110.8
  TOP w0.2: U10.3@27.85,12.05 C404.2@27.85,12.561
  TOP w0.25: C603.1@16.475,5.4 TELEM1+FRSKY.1@17.25,5.4 ; v3(16.5,5) C603.1@16.5,5.4 ; CAN1.1@31.25,8.375 v10(32.5,8.375)
  TOP w0.3: v3(3.75,16.45) 3.75,15.15 TELEM2.1@4.1,14.8
  TOP w0.4: OSD.1@12.275,31.25 13.6,31.25 ; C601.1@13.6,30.5 13.6,31.25 ; v3(14.25,31.9) 13.6,31.25
  3 w0.5: v3(14.25,31.9) 14.25,34.25 ; 16.5,0.75 v3(16.5,5)
  3 w1: v7(18.25,34.5) 7.7,34.5 1,27.8 1,6.7 2.2,5.5 3.7,5.5 5.5,3.7 5.5,2.25 7,0.75 27.05,0.75 32.5,6.2 v10(32.5,8.375) 33.5,9.375 33.5,12 v10(32.5,13)
  2 w0.15: v1(4.775,14.75) v1(7.075,14.75)
  2 w0.25: v1(27.95,13) v10(32.5,13)
  BOT w0.4: v11(1,16.45) EMI201.1@4.75,16.45
  other v7: 16.75,34.5 17.5,34.5
VDD_5V_RECEIVER: FR106.2 PPM-RSSI-SBUS-SPEKTRUM.1 | length 18.5
  TOP w0.25: v3(3.5,27.5) PPM-RSSI-SBUS-SPEKTRUM.1@4.75,27.5
  3 w0.3: v3(3.5,27.5) 6.9,27.5 9.4,25 v2(19.75,25)
VDD_5V_SENS: R430.1 R431.1 U301.29 | length 4.1
  TOP w0.15: R431.1@7.1,20.125 7.1,19.7 7.3,19.5 U301.29@9.725,19.5
  TOP w0.2: R430.1@6.15,20.125 R431.1@7.1,20.125
VDD_BRICK_VALID: R103.2 R105.1 U301.91 | length 6.8
  TOP w0.15: v1(23.5,16.5) U301.91@24.775,16.5
  2 w0.15: v1(23.5,16.5) v3(23.5,18)
  BOT w0.15: v3(23.5,18) 25.275,18 R105.1@25.775,18.5
  BOT w0.3: R105.1@25.775,18.5 R103.2@25.775,20
VDD_SERVO: VDD_SERVO_1_6.1 VDD_SERVO_1_6.2 VDD_SERVO_1_6.3 VDD_SERVO_1_6.4 VDD_SERVO_1_6.5 VDD_SERVO_1_6.6 | length 50.8
  TOP w1.5: VDD_SERVO_1_6.1@32.283,16.25 VDD_SERVO_1_6.2@32.283,18.79 VDD_SERVO_1_6.3@32.283,21.33 VDD_SERVO_1_6.4@32.283,23.87 VDD_SERVO_1_6.5@32.283,26.41 VDD_SERVO_1_6.6@32.283,28.95
  3 w1.2: VDD_SERVO_1_6.1@32.283,16.25 VDD_SERVO_1_6.2@32.283,18.79 VDD_SERVO_1_6.3@32.283,21.33 VDD_SERVO_1_6.4@32.283,23.87 VDD_SERVO_1_6.5@32.283,26.41 VDD_SERVO_1_6.6@32.283,28.95
  2 w1.2: VDD_SERVO_1_6.1@32.283,16.25 VDD_SERVO_1_6.6@32.283,28.95
  BOT w1.5: VDD_SERVO_1_6.1@32.283,16.25 VDD_SERVO_1_6.2@32.283,18.79 VDD_SERVO_1_6.3@32.283,21.33 VDD_SERVO_1_6.4@32.283,23.87 VDD_SERVO_1_6.5@32.283,26.41 VDD_SERVO_1_6.6@32.283,28.95
pads on no net: J401.4 p1.1 p2.1 p3.1 p4.1 U103.4 U301.69 U301.90 U304.4 U501.2 U501.3 U501.4 U501.5 U501.6 U501.7 U501.14 U501.15 U501.16 U501.17 U501.19 U501.21 U502.3 U502.7 U502.14 U503.4 U504.4 uSD401.9

## Polygon pours and split planes (outlines as drawn)
VDD_5V_IN on BOT "BOT-No Net" (solid, remove dead copper, pour order 81): 16.5,34 18.6,34 18.6,30 17.45,30 16.75,29.3 16.75,28.25 16,28.25 16,30.75 16.95,30.75 17.1,30.9 17.1,31.65 17,31.75 16.5,31.75
NetD102_2 on BOT "BOT-No Net" (solid, pour order 74): 23,24 23,22 19,22 19,24 23,24
VDD_5V_IN on BOT "BOT-No Net" (solid, pour order 80): 26.4,23.75 25.2,23.75 25,23.55 25,22 23.25,22 23.25,26.25 26.4,26.25
VDD_5V_BRICK on BOT "TOP-No Net" (solid, pour order 96): 26,32.1 26,28 28,28 28,32.1
VDD_3V3 on BOT "TOP-No Net" (solid, pour order 102): 11.2,29.25 11.2,28.5 9.6,28.5 9.5,28.4 9.5,28.25 6.75,28.25 6.75,29.25
PERIPH_3V3_EN on BOT "TOP-No Net" (solid, pour order 109): 11.85,27.5 13.45,27.5 13.55,27.6 13.55,27.75 14.75,27.75 14.75,26.75 11.85,26.75
VDD_3V3_SENSORS_EN on BOT "TOP-No Net" (solid, pour order 112): 11.85,23.6 13.4,23.6 13.55,23.75 13.55,24 14.75,24 14.75,23 11.85,23.003
GND on BOT "TOP-No Net" (solid, pour order 116): 13.35,28.3 9.7,28.3 9.7,28.15 9.55,28 6.75,28 6.75,26.75 9.5,26.75 9.5,27.35 9.7,27.55 11.65,27.55 11.8,27.7 13.35,27.7
VDD_3V3_SENSORS on BOT "TOP-No Net" (solid, pour order 107): 11.2,25.5 11.2,24.9 9.65,24.9 9.25,24.5 6.75,24.5 6.75,25.5
GND on BOT "TOP-No Net" (solid, pour order 93): 6.75,24.3 9.35,24.3 9.75,24.7 13.35,24.7 13.35,23.8 9.65,23.8 9.5,23.65 9.5,23 6.75,23
NetC103_2 on BOT "BOT-No Net" (solid, pour order 83): 28,25.45 26.75,25.45 26.75,26.4 26.6,26.55 23.25,26.55 23.25,30 25.75,30 25.75,27.9 25.95,27.7 28,27.7 28,25.45
NetC509_2 on BOT "TOP-No Net" (solid, pour order 101): 11.85,24.9 13.4,24.9 13.55,24.75 13.55,24.5 16.25,24.5 16.5,24.75 18.5,24.75 18.5,25.5 11.85,25.5
VDD_5V_IN on BOT "BOT-No Net" (solid, pour order 92): 16.75,23.85 16.75,22 18.5,22 18.5,23.85
GND on BOT "BOT-No Net" (solid, remove dead copper, pour order 22): 18.5,24.55 16.6,24.55 16.35,24.3 15,24.3 15,22.9 14.9,22.8 11.85,22.8 11.85,22 16.55,22 16.55,23.9 16.7,24.05 18.5,24.05
GND on BOT "BOT-No Net" (solid, pour order 87): 23,32.1 21,32.1 21,24.25 23,24.25
VDD_5V_PERIPH on BOT "BOT-No Net" (solid, remove dead copper, pour order 28): 16.5,35.75 18.5,35.75 18.5,34.25 16.5,34.25 16.5,35.75
VDD_5V_IN on BOT "BOT-No Net" (solid, pour order 65): 11.85,29.25 11.85,28.5 13.45,28.5 13.55,28.4 13.55,28.25 16.25,28.25 16.25,30.75 14,30.75 14,29.5 13.75,29.25
GND on BOT "BOT-No Net" (solid, remove dead copper, pour order 32): 0,35.997 36,35.997 36,-0.003 0,-0.003 0,35.997
VDD_5V_IN on TOP "TOP-No Net" (solid, pour order 113): 25.7,25.6 27.575,25.6 27.725,25.75 27.725,26.75 27.575,26.9 26,26.9 26,27.8 29.75,27.8 29.75,23 27.45,23 27.45,24.5 27.25,24.7 25.7,24.7
FMU_VDD_3V3 on TOP "BOT-No Net" (solid, remove dead copper, pour order 66): 10.75,9.2 13.5,9.2 14.2,8.5 23.75,8.5 23.75,14.75 11.5,14.75 11.5,13.75 12.25,13 20,13 20,10.25 10.75,10.25
FMU_VDD_3V3 on TOP "BOT-No Net" (solid, remove dead copper, pour order 68): 10.75,20.75 10.9,20.9 12,20.9 12.6,21.5 23.4,21.5 23.65,21.75 24.15,21.75 24.15,21.35 24,21.2 24,20.8 22.9,19.7 10.75,19.7
FMU_VDD_3V3 on TOP "BOT-No Net" (solid, remove dead copper, pour order 70): 21.25,26 23.6,26 23.65,25.95 23.65,25.75 23.8,25.6 25.5,25.6 25.5,24.6 25.6,24.5 25.7,24.5 25.7,21.35 23.6,21.35 23.6,23.95 23.4,24.15 22.8,24.15 22.2,24.75 21.35,24.75 21.25,24.85
GND on TOP "TOP-No Net" (solid, pour order 89): 21.25,27.5 23.65,27.5 23.65,26.85 23.8,26.7 27.5,26.7 27.5,25.8 23.85,25.8 23.85,26 23.6,26.25 21.25,26.25
GND on TOP "BOT-No Net" (solid, remove dead copper, pour order 38): 0,0 36,0 36,36 0,36 0,0
VDD_5V_IN on 3 "BOT-No Net" (solid, remove dead copper, pour order 26): 17.2,32 23.1,32 23.1,30.55 23,30.55 22.9,30.65 17.2,30.65 17.1,30.75 17.1,31.9
VDD_5V_IN on 3 "BOT-No Net" (solid, remove dead copper, pour order 24): 23,22 25,22 25,23.55 25.2,23.75 29,23.75 29,28.5 25.5,32 23,32
GND on 3 "BOT-No Net" (solid, remove dead copper, pour order 34): 0,35.997 36,35.997 36,-0.003 0,-0.003 0,35.947
GND on 2 "BOT-No Net" (solid, remove dead copper, pour order 36): 0,35.95 0,36 36,36 36,0 0,0 0,36
FMU_VDD_3V3 on 2 "BOT-No Net" (solid, remove dead copper, pour order 31): 17.25,21.5 21,21.5 21,8.5 17.25,8.5

## Keep-outs
Keep-Out Layer:
  lines w0.1: 0,-0.003 0,35.997 36,35.997 36,-0.003 0,-0.003

## Other copper
TOP:
  pour cut-out: 22.5,8.7 23.05,8.7 23.05,6.55 22.45,6.55 22.45,8.65
  pour cut-out: 9.15,28.4 8.35,28.4 8.35,29.25 9.5,29.25 9.5,28.6 9.15,28.6
  pour cut-out: 9.45,28.95 10.85,28.95 10.85,27.75 9.45,27.75
  pour cut-out: 0,21.675 3.15,21.675 3.15,19.625 0,19.625
  pour cut-out: 8.12,16.97 8.15,17 10.75,17 10.75,10.75 8.75,10.75 8.75,16 8.12,16
  pour cut-out: 28.25,0 28.25,3.15 30.25,3.15 30.25,0
  pour cut-out: 14.65,0 14.65,3.15 16.65,3.15 16.65,0
  pour cut-out: 0,7.7 3.15,7.7 3.15,5.65 0,5.65
  pour cut-out: 0,17.55 3.15,17.55 3.15,15.5 0,15.5
  pour cut-out: 0,30.3 3.15,30.3 3.15,28.3 0,28.3
  pour cut-out: 13.1,36 13.1,32.9 15.05,32.9 15.05,35.997
  pour cut-out: 5.75,32.9 7.7,32.9 7.7,35.997 7.747,36 5.75,36
  pour cut-out: 36,14.95 32.85,14.95 32.85,12.9 36,12.9
  pour cut-out: 36,7.6 32.85,7.6 32.85,5.55 36,5.55
  pour cut-out: 14.427,2.653 14.427,0.253 5.577,0.253 5.577,2.653 6.577,2.653 6.577,5.053 13.427,5.053 13.427,2.653
  pour cut-out: 6.25,4.75 6.25,6.25 4.75,6.25 4.75,4.75
  pour cut-out: 30.75,30.25 30.75,31.75 29.25,31.75 29.25,30.25
  pour cut-out: 36,29.9 33.9,29.9 33.9,15.3 36,15.3
  pour cut-out: 24.95,6.05 25.9,6.05 25.9,6.95 25.9,7.95 24.95,7.95
  pour cut-out: 26.75,11.05 27.2,11.05 27.2,9.45 26.75,9.45 26.75,8.25 29.6,8.25 29.6,9.45 29.35,9.45 29.35,11.05 29.6,11.05 29.6,13.65 26.75,13.65
  pour cut-out: 30.25,12.6 30.25,11.65 32.5,11.65 32.5,12.6
  pour cut-out: 19.5,35.997 19.5,33.75 20.85,33.75 20.85,35.997
  pour cut-out: 3.75,8.95 3.75,8 5.7,8 5.7,8.95
  pour cut-out: 7.8,11 7.8,10.05 6.9,10.05 6.9,11
  pour cut-out: 23.25,5.75 24.15,5.75 24.15,3.75 23.25,3.75
  pour cut-out: 27,5.75 27.9,5.75 27.9,3.75 27,3.75
  pour cut-out: 13.45,23.9 15.05,23.9 15.05,21.5 13.45,21.5
  pour cut-out: 6.65,20.3 6.65,21.45 11.1,21.45 11.1,20.3
  pour cut-out: 24,20.8 27.2,20.8 27.2,19.55 23.75,19.55 23.75,20.55
  pour cut-out: 18.7,29.1 18.7,30.05 17.8,30.05 17.8,29.1
  pour cut-out: 8.05,30.25 8.05,32.25 9.35,32.25 9.4,30.25
  pour cut-out: 16.9,31.675 15.8,31.675 15.8,30.325 16.9,30.325
  pour cut-out: 14.9,30.025 14.9,30.975 14,30.975 14,30.025
  pour cut-out: 18.65,34.6 18.65,35.85 17.35,35.85 17.35,34.6
  pour cut-out: 3.75,24.2 5.75,24.2 5.75,23.3 3.75,23.3
  pour cut-out: 7.45,15.2 8.4,15.2 8.4,14.3 7.45,14.3
  pour cut-out: 7.45,26.5 6.2,26.5 6.2,27.3 7.45,27.3
  pour cut-out: 16,5.1 15.15,5.1 15.15,5.9 16,5.9
  pour cut-out: 27.2,17.7 28.15,17.7 28.15,16.8 27.2,16.8
  pour cut-out: 8.25,6.15 8.25,5.25 7.3,5.25 7.3,6.15
  pour cut-out: 18.95,24.7 20.7,24.7 20.7,21.6 18.5,21.6 18.5,23.85 18.95,23.85
3:
  pour cut-out: 33.9,29.9 33.9,15.3 36,15.3 36,29.9
2:
  pour cut-out: 36,29.9 33.9,29.9 33.9,15.3 36,15.3
BOT:
  pour cut-out: 25.75,32.25 25.75,30 23.25,30 23.25,32.25
  pour cut-out: 26.4,19.15 26.4,17.85 27.85,17.85 27.85,19.15
  pour cut-out: 18.6,18.4 20.4,18.4 20.4,19 20.4,21 18.6,21
  pour cut-out: 22.2,18.4 24,18.4 24,21 22.2,21
  pour cut-out: 36,29.9 33.9,29.9 33.9,15.3 36,15.3
  pour cut-out: 13.9,15 16.05,15 16.05,13.1 13.9,13.1
  pour cut-out: 28.7,15 30.45,15 30.45,13.1 28.7,13.1
  pour cut-out: 28.7,5.8 30.45,5.8 30.45,3.1 28.7,3.1
  pour cut-out: 13.2,5.8 14.95,5.8 14.95,3.1 13.2,3.1
  pour cut-out: 0,28.3 3.15,28.3 3.15,30.3 0,30.3
  pour cut-out: 18.6,35.997 18.6,32.85 20.6,32.85 20.6,35.997
  pour cut-out: 28.4,35.997 28.4,32.85 30.45,32.85 30.45,35.997
  pour cut-out: 36,7.581 33.85,7.581 33.85,5.881 36,5.881
  pour cut-out: 36,15.15 33.85,15.15 33.85,13.45 36,13.45
  pour cut-out: 4.75,29.75 4.75,31.25 6.25,31.25 6.25,29.75
  pour cut-out: 29.75,5.75 29.75,7.25 31.25,7.25 31.25,5.75
  pour cut-out: 30.1,8.55 32.1,8.55 32.1,7.5 30.1,7.5
  pour cut-out: 14.2,0.55 13.1,0.55 12.9,0.35 11.1,0.35 10.8,0.65 10.8,1.05 11.1,1.35 12.85,1.35 12.9,1.4 12.9,2.45 14.2,2.45
  pour cut-out: 0.7,11.9 0.7,14.1 2.1,14.1 2.1,11.9
  pour cut-out: 1.6,8.1 0.7,8.1 0.7,9.05 1.6,9.05
  pour cut-out: 0,20.4 0,18.5 3.1,18.5 3.1,20.4
  pour cut-out: 5.5,17.6 4,17.6 4,16.9 5.5,16.9
  pour cut-out: 19.8,29.45 16.75,29.45 16.75,26.75 14.75,26.75 14.75,26.55 18.8,26.55 19.8,27.55
  pour cut-out: 5.75,27.95 3.75,27.95 3.75,27.05 5.75,27.05
  pour cut-out: 14.225,35.997 14.225,32.85 16.4,32.85 16.4,36
  pour cut-out: 5.625,35.997 5.625,32.85 7.675,32.85 7.675,35.997
  pour cut-out: 10.35,20.55 7.25,20.55 6.65,19.95 6.65,16.85 10.35,16.85
  pour cut-out: 10.5,11.55 6.45,11.55 6.45,7.5 10.5,7.5
  pour cut-out: 8.35,13.35 8.35,11.55 9.85,11.55 9.85,13.35
  pour cut-out: 9.45,16.85 7.45,16.85 7.45,14.55 9.45,14.55
  pour cut-out: 12.625,12.35 12.625,10.45 13.575,10.45 13.575,12.35
  pour cut-out: 14.8,21.95 16.9,21.95 16.9,21.1 14.8,21.1
  pour cut-out: 13,21.95 13,21.05 12.05,21.05 12.05,21.95
  pour cut-out: 12,20.75 13.9,20.75 13.9,20.55 14.1,20.55 14.1,20.75 14.8,20.75 14.8,20.45 16,20.45 16,16.75 14.1,16.75 14.1,16.95 13.9,16.95 13.9,16.75 13.6,16.75 13.6,16.95 13.4,16.95 13.4,16.75 12,16.75
  pour cut-out: 6.35,30.7 7.3,30.7 7.3,29.8 6.35,29.8
  pour cut-out: 25.85,15.9 25.85,13.4 25.5,13.4 25.5,15.9
  pour cut-out: 24.75,15.9 24.75,13.4 24.4,13.4 24.4,15.9

## Silkscreen, mask and mechanical layers (free items; w line width, h text height)
Top Overlay:
  circle w0.1: c2.75,33.25 r3
  circle w0.1: c33.25,33.25 r3
  circle w0.1: c33.25,2.75 r3
  circle w0.1: c2.75,2.75 r3
  rectangle: 15.7,32 15.8,33
  region: 3.75,18.6 5,19.85 5,17.35
  region: 15.2,32 15.2,33 15.7,32.5
  region: 0.5,18.85 0.25,18.6 0.75,18.6
  lines w0.15: 16.4,25.15 16.4,27.35 ; 19.6,25.15 19.6,27.35 ; 22.425,25.175 22.425,27.35 ; 23.75,25.15 23.75,27.35 ; 27.15,8.15 29.35,8.15 ; 27.15,12.35 29.35,12.35
  text "ESP8266" at 19.8,31.45 h0.7
  text "OSD" at 5,30 h0.75
  text "RC" at 5.05,29.35 h0.75 r270
  text "3V3" at 24.4,23.25 h0.5 r270
  text "XRacer" at 9.4,22.3 h1.52 r45
  text "flight" at 5.35,18.2 h1.25
  text "TL2" at 5.2,17.2 h0.75 r270
  text "27092015-2345" at 12.25,14.5 h0.75
  text "auav.co" at 6,12.4 h1.75 r270
  text "CAN" at 30.95,5.75 h0.75 r90
  text "TL1" at 28.25,5 h0.75
Bottom Overlay:
  circle w0.1: c2.75,2.75 r3
  circle w0.1: c33.25,2.75 r3
  circle w0.1: c33.25,33.25 r3
  circle w0.1: c2.75,33.25 r3
  rectangle: 27.95,13.55 28.55,15.55
  text "BTBZ" at 16.75,30.05 h0.75
  text "PWR" at 20.55,30.05 h0.75
  text "G+S" at 31.45,30.05 h0.75
  text "3V3" at 8.65,29.4 h0.5
  text "6" at 28.6,28.75 h0.75
  text "5V-IN" at 25,27.65 h0.5 r270
  text "5" at 28.6,26.15 h0.75
  text "3V3" at 8.65,25.65 h0.5
  text "4" at 28.6,23.6 h0.75
  text "C2" at 8.25,21.25 h0.5
  text "3" at 28.6,21.1 h0.75
  text "C14" at 17.55,20 h0.5 r45
  text "N.Arsov &" at 11.9,19.9 h1.5 r90
  text "XRacer V1.0" at 6.45,19.65 h1.5 r90
  text "C15" at 18.1,19.45 h0.5 r45
  text "2" at 28.6,18.5 h0.75
  text "GPS" at 2.5,17.5 h0.75
  text "D15" at 10.7,16.3 h0.5
  text "1" at 28.6,16 h0.75
  text "P.Kocmoud" at 14.15,14.5 h1.45 r90
  text "A6" at 9.15,13.5 h0.5
  text "E15" at 6,11.1 h0.5 r90
  text "E12" at 12.35,9.05 h0.5
  text "A5" at 8.85,6.95 h0.5
  text "A7" at 11.1,6.95 h0.5
  text "arsovtech.com" at 10.15,5.9 h1.52
Top Solder:
  circle w0.35: c24.65,23.85 r0.17
Bottom Solder:
  circle w0.5: c25.3,27.05 r0.25
Mechanical 15:
  lines w2: -1,16.25 -1,-1 16.25,-1 ; -1,19.75 -1,37 16.25,37 ; 19.75,-1 37,-1 37,16.25 ; 19.75,37 37,37 37,19.75